# Altium PCB LM135Z.PcbDoc
Units mm, origin at the board's own origin, x right, y up, seen from the top; angles counter-clockwise.
Board outline 116 x 72 mm, 2 copper layers (Top Layer, Bottom Layer); 59 components, 51 nets, 376 pads, 142 vias.
Unrouted connection lines stored in the file: 47.
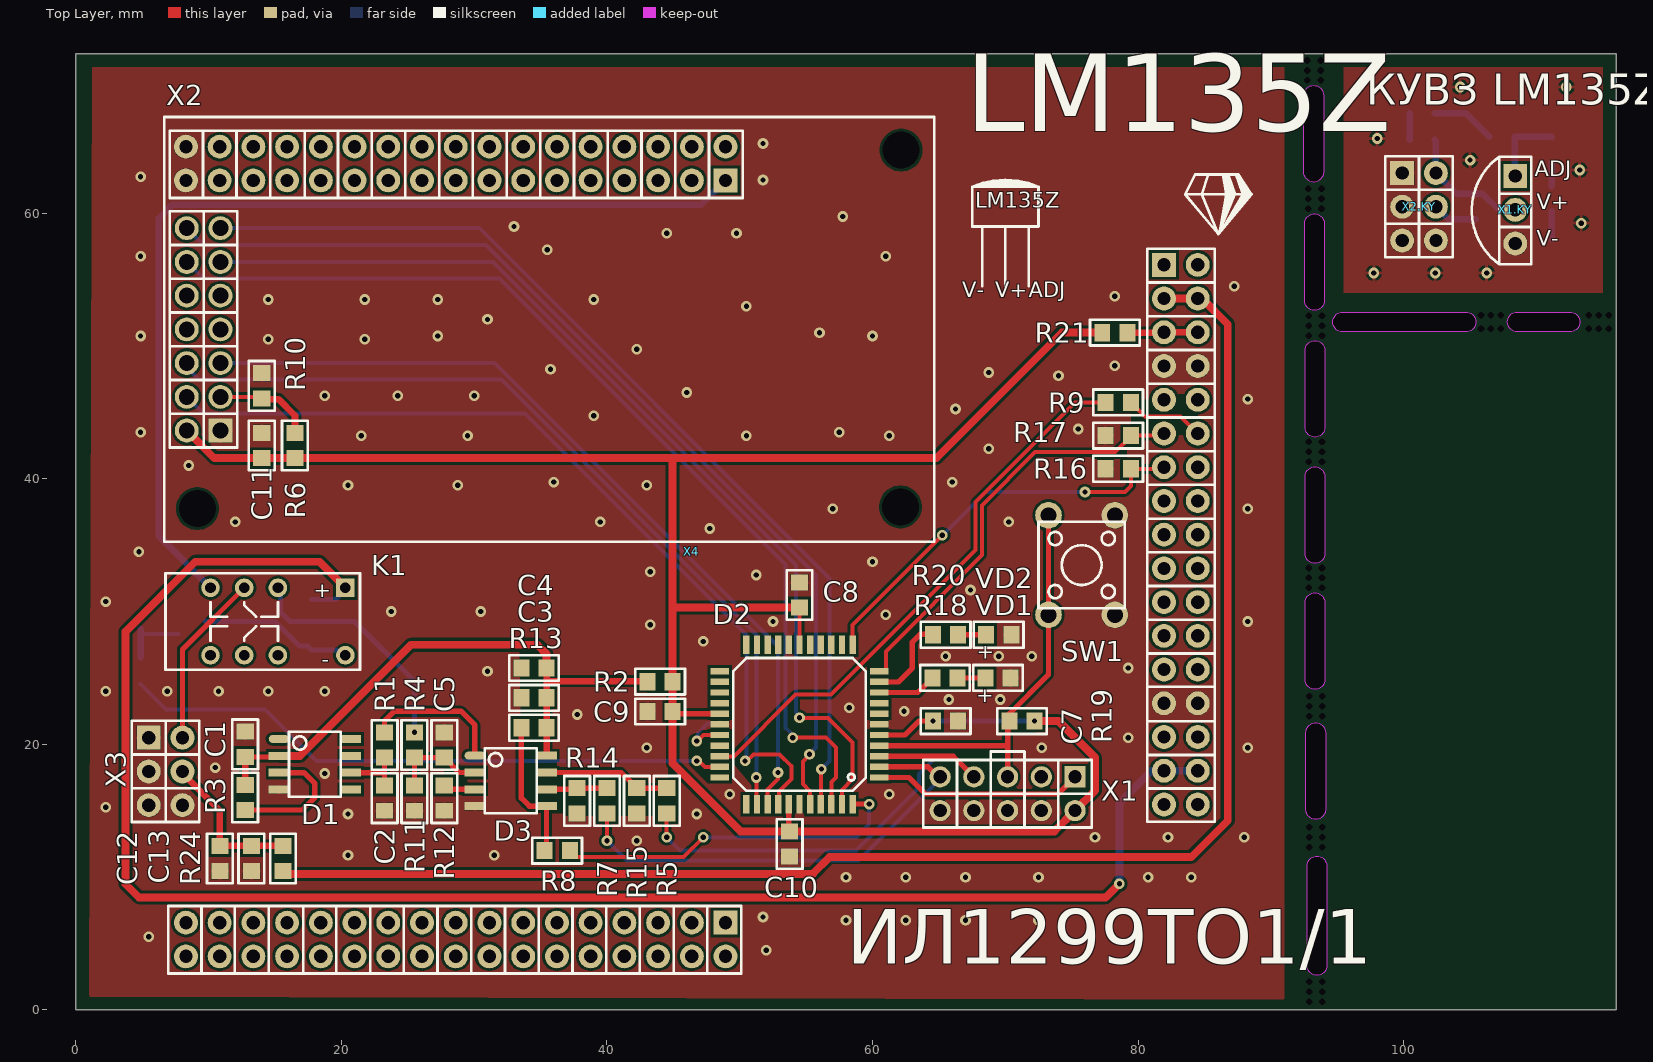
[diagram p0: Top Layer view]
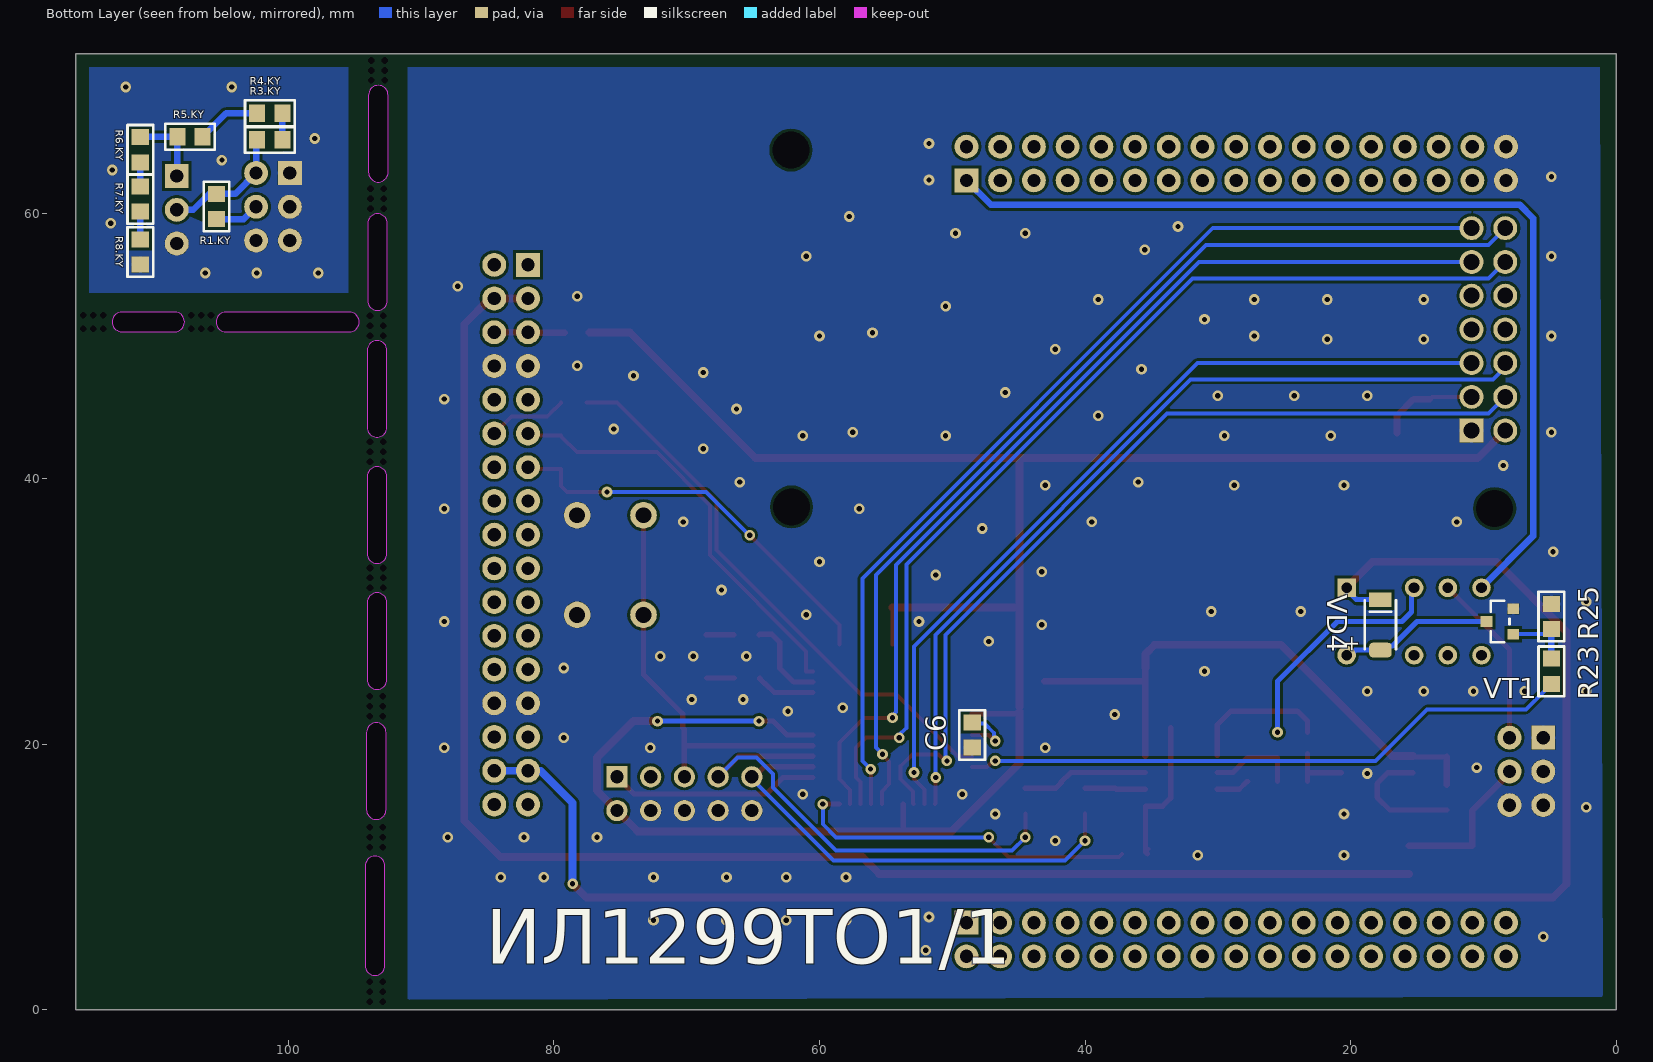
[diagram p1: Bottom Layer view, seen from below]

## Layer stack, top to bottom
Top Solder: solder mask 0.0102, Solder Resist, Dk 3.5
Top Layer: signal copper 0.0356
Dielectric 1: dielectric 0.32, FR-4, Dk 4.8
Bottom Layer: signal copper 0.0356
Bottom Solder: solder mask 0.0102, Solder Resist, Dk 3.5

## Board outline
0,0 116,0 116,72 0,72
cut-out: 94.06,24.87 cw(c93.318,24.87) 92.576,24.87 92.576,30.666 cw(c93.318,30.666) 94.06,30.666
cut-out: 94.21,3.33 cw(c93.468,3.33) 92.727,3.33 92.727,10.839 cw(c93.468,10.839) 94.21,10.839
cut-out: 94.06,34.37 cw(c93.318,34.37) 92.576,34.37 92.576,40.166 cw(c93.318,40.166) 94.06,40.166
cut-out: 94.06,43.87 cw(c93.318,43.87) 92.576,43.87 92.576,49.666 cw(c93.318,49.666) 94.06,49.666
cut-out: 94.022,53.423 cw(c93.28,53.423) 92.539,53.423 92.539,59.219 cw(c93.28,59.219) 94.022,59.219
cut-out: 93.964,63.087 cw(c93.223,63.087) 92.481,63.087 92.481,68.883 cw(c93.223,68.883) 93.964,68.883
cut-out: 94.117,15.087 cw(c93.375,15.087) 92.633,15.087 92.633,20.883 cw(c93.375,20.883) 94.117,20.883
cut-out: 112.527,52.55 cw(c112.527,51.809) 112.527,51.067 108.405,51.067 cw(c108.578,51.809) 108.405,52.55
cut-out: 104.698,52.548 cw(c104.698,51.806) 104.698,51.064 95.25,51.064 cw(c95.423,51.806) 95.25,52.548

## Design rules (kind name [scope] priority, off if disabled: settings)
Clearance [All] p1: gap=0.2 ignorepadtopadclearanceinfootprint=FALSE
ComponentClearance [All] p1: gap=0 collisioncheckmode=3 verticalgap=0 showdistances=FALSE
HoleSize [All] p1: absolutevalues=TRUE maxlimit=3 minlimit=0.025 maxpercent=80.000 minpercent=20.000
HoleToHoleClearance [All] p1: gap=0.2 allowstackedmicrovias=TRUE
MinimumSolderMaskSliver [All] p1: minsoldermaskwidth=0
PolygonConnect [All vs InNet('GND') AND IsVia] p1: connectstyle=Direct reliefconductorwidth=0.254 reliefentries=4 polygonreliefangle="90 Angle" airgapwidth=0.254
RoutingVias [All] p1: holewidth=0.6 width=1.2 viastyle="Through Hole" minholewidth=0.4 minwidth=0.8 maxholewidth=0.8 maxwidth=1.6
SilkToSilkClearance [All] p1: silktosilkclearance=0
SilkToSolderMaskClearance [IsPad] p1: minsilkscreentomaskgap=0 clearancetoexposedcopper=TRUE
SolderMaskExpansion [All] p1: expansion=0.102 istentingtop=FALSE
Width [All] p1: maxlimit=0.6 minlimit=0.2 preferedwidth=0.3
24 further rules are at their usual default settings.

## Classes and differential pairs
component class LM135Z_1: C1 C2 C3 C4 C5 C6 C7 C8 C9 C10 C11 C12 C13 D1 D2 D3 K1 R1 R2 R3 R4 R5 R6 R7 R8 R9 R10 R11 R12 R13 R14 R15 R16 R17 R18 R19 R20 R21 R23 R24 R25 SW1 VD1 VD2 VD4 VT1 X1 X2 X3
component class "Formula connector": R1.KY R3.KY R4.KY R5.KY R6.KY R7.KY R8.KY X1.KY X2.KY X4

## Components (designator, comment, footprint, x,y, rotation, side; value= is the part's Value field where it differs from the comment)
C1 "C0805" 0805 12.75,20 r90 top value=0.1uF
C2 "C0805" 0805 23.25,15.95 r270 top value=1uF
C3 "C0805" 0805 34.5,23.5 r180 top value=1uF
C4 "C0805" 0805 34.5,25.75 r180 top value=47uF
C5 "C0805" 0805 27.75,19.95 r90 top value=0.01uF
C6 "C0805" 0805 48.5,20.7 r270 bottom value=0.1uF
C7 "C0805" 0805 65.5,21.75 r0 top value=10uF
C8 "C0805" 0805 54.5,31.25 r90 top value=0.1uF
C9 "C0805" 0805 44,22.47 r180 top value=0.1uF
C10 "C0805" 0805 53.75,12.5 r270 top value=0.1uF
C11 "C0805" 0805 14,42.5 r90 top value=0.1uF
C12 "C0805" 0805 10.85,11.4 r270 top value=0.1uF
C13 "C0805" 0805 13.225,11.4 r270 top value=47uF
D1 "REF198ESZ" "SOIC-8(Microchip) - duplicate" 18,18.5 r0 top
D2 "ATMEGA16A-AU (TQFP-44)" 44-TQFP 54.5,21.5 r180 top locked
D3 "MCP3201-BI (SO-8)" "SOIC-8(Microchip) - duplicate" 32.75,17.25 r0 top
K1 "V23079A1001B301 TE" V23079A1001B301 14,29.25 r180 top locked
R1 "R0805 Yageo" 0805 23.25,19.95 r90 top value=10
R1.KY "R0805 Yageo" 0805 105.405,60.505 r90 bottom value=0
R2 "R0805 Yageo" 0805 44,24.72 r0 top value=1
R3 "R0805 Yageo" 0805 12.75,16 r90 top value=1k
R3.KY "R0805 Yageo" 0805 101.395,65.525 r0 bottom value=0
R4 "R0805 Yageo" 0805 25.5,19.95 r270 top value=100
R4.KY "R0805 Yageo" 0805 101.395,67.525 r180 bottom value=0
R5 "R0805 Yageo" 0805 44.5,15.75 r90 top value=1k
R5.KY "R0805 Yageo" 0805 107.405,65.755 r180 bottom value=0
R6 "R0805 Yageo" 0805 16.5,42.5 r90 top value=3.9k
R6.KY "R0805 Yageo" 0805 111.145,64.775 r90 bottom value=0
R7 "R0805 Yageo" 0805 40,15.75 r90 top value=1k
R7.KY "R0805 Yageo" 0805 111.145,61.075 r90 bottom value=0
R8 "R0805 Yageo" 0805 36.25,12 r180 top value=1k
R8.KY "R0805 Yageo" 0805 111.145,57.075 r90 bottom value=0
R9 "R0805 Yageo" 0805 78.5,45.75 r180 top value=2.2k
R10 "R0805 Yageo" 0805 14,47 r270 top value=680
R11 "R0805 Yageo" 0805 25.5,15.95 r270 top value=300k
R12 "R0805 Yageo" 0805 27.75,15.95 r270 top value=0
R13 "R0805 Yageo" 0805 34.5,21.25 r0 top value=20k
R14 "R0805 Yageo" 0805 37.75,15.75 r270 top value=20k
R15 "R0805 Yageo" 0805 42.25,15.75 r270 top value=20k
R16 "R0805 Yageo" 0805 78.5,40.75 r0 top value=10k
R17 "R0805 Yageo" 0805 78.5,43.25 r0 top value=10k
R18 "R0805 Yageo" 0805 65.45,25 r0 top value=2.2k
R19 "R0805 Yageo" 0805 71.25,21.75 r180 top value=10k
R20 "R0805 Yageo" 0805 65.5,28.25 r0 top value=2.2k
R21 "R0805 Yageo" 0805 78.25,51 r180 top value=1
R23 "R0805 Yageo" 0805 4.875,25.5 r90 bottom value=4.7k
R24 "R0805 Yageo" 0805 15.6,11.4 r270 top value=0
R25 "R0805 Yageo" 0805 4.875,29.625 r90 bottom value=20k
SW1 "ВКН1" BKN1 75.75,33.5 r90 top
VD1 "LED(0805)" 0805(LED) 69.45,25 r0 top
VD2 "LED(0805)" 0805(LED) 69.5,28.25 r0 top
VD4 "LL4148 NXP" SOD80C 17.75,29 r90 bottom
VT1 "MMBT5551L" SOT-23 8.75,29.25 r90 bottom
X1 "PLD10-2,54" PLD10-2,54 75.25,15 r180 top locked
X1.KY "LM135Z" LM135Z 108.405,60.255 r270 top
X2 "PLD14-2,54" PLD14-2,54 35.25,51.25 r0 top locked
X2.KY "PLD6-2,54" PLD6-2,54 99.895,63.025 r270 top
X3 "PLD6-2,54" PLD6-2,54 5.5,20.5 r270 top
X4 "FORMULA" FORMULA 36.75,33.25 r0 top locked

## Footprints (in the part's own frame and the unit in brackets; to place one, negate y for a bottom-side part, rotate by r counter-clockwise, add the part's x,y. Pads: shape width x height; smd on the part's side, far side on the other; paste and mask are expansions set on the pad)
44-TQFP [mm]
  rect 1.4x0.48 smd: 1(-6,4) 2(-6,3.2) 3(-6,2.4) 4(-6,1.6) 5(-6,0.8) 6(-6,0) 7(-6,-0.8) 8(-6,-1.6) 9(-6,-2.4) 10(-6,-3.2) 11(-6,-4) 23(6,-4) 24(6,-3.2) 25(6,-2.4) 26(6,-1.6) 27(6,-0.8) 28(6,0) 29(6,0.8) 30(6,1.6) 31(6,2.4) 32(6,3.2) 33(6,4)
  rect 0.48x1.4 smd: 12(-4,-6) 13(-3.2,-6) 14(-2.4,-6) 15(-1.6,-6) 16(-0.8,-6) 17(0,-6) 18(0.8,-6) 19(1.6,-6) 20(2.4,-6) 21(3.2,-6) 22(4,-6) 34(4,6) 35(3.2,6) 36(2.4,6) 37(1.6,6) 38(0.8,6) 39(0,6) 40(-0.8,6) 41(-1.6,6) 42(-2.4,6) 43(-3.2,6) 44(-4,6)
  silkscreen extent -5,-5 5,5
0805 [mm]
  rect 1.2x1.3 smd: 1(-0.95,0) 2(0.95,0)
  silkscreen extent -1.87,-0.97 1.87,0.97, body extent -1.05,-0.63 0.95,0.63, height 0.55
0805(LED) [mm]
  rect 1.2x1.3 smd: 1(-0.95,0) 2(0.95,0)
  silkscreen extent -1.87,-0.97 1.87,0.97, body extent -1.03,-0.41 1.03,0.5, height 0.85
BKN1 [mm]
  round 2 hole 1.2: 1(-3.75,2.5) 1(3.75,2.5) 2(-3.75,-2.5) 2(3.75,-2.5)
  silkscreen extent -3.25,-3.25 3.25,3.25, body extent -3.9,-3.25 3.9,3.25, height 5.19
FORMULA [mm]
  rect 1.8x1.8 hole 1: 1(12.18,29.22) VDDF(12.18,-26.68) VEEF(45.2,22.86)
  round 1.8 hole 1: 2(9.64,29.22) 3(7.1,29.22) 4(4.56,29.22) 5(2.02,29.22) 6(-0.52,29.22) 7(-3.06,29.22) 8(-5.6,29.22) 9(-8.14,29.22) 10(-10.68,29.22) 11(-13.22,29.22) 12(-15.76,29.22) 13(-18.3,29.22) 14(-20.84,29.22) 15(-23.38,29.22) 16(-25.92,29.22) 17(12.18,31.76) 18(9.64,31.76) 19(7.1,31.76) 20(4.56,31.76) 21(2.02,31.76) 22(-0.52,31.76) 23(-3.06,31.76) 24(-5.6,31.76) 25(-8.14,31.76) 26(-10.68,31.76) 27(-13.22,31.76) 28(-15.76,31.76) 29(-18.3,31.76) 30(-20.84,31.76) 31(-23.38,31.76) 32(-25.92,31.76) 33(-28.46,-29.22) 34(-25.92,-29.22) 35(-23.38,-29.22) 36(-20.84,-29.22) 37(-18.3,-29.22) 38(-15.76,-29.22) 39(-13.22,-29.22) 40(-10.68,-29.22) 41(-8.14,-29.22) 42(-5.6,-29.22) 43(-3.06,-29.22) 44(-0.52,-29.22) 45(2.02,-29.22) 46(4.56,-29.22) 47(7.1,-29.22) 48(9.64,-29.22) 49(-28.46,-26.68) 50(-25.92,-26.68) 51(-23.38,-26.68) 52(-20.84,-26.68) 53(-18.3,-26.68) 54(-15.76,-26.68) 55(-13.22,-26.68) 56(-10.68,-26.68) 57(-8.14,-26.68) 58(-5.6,-26.68) 59(-3.06,-26.68) 60(-0.52,-26.68) 61(2.02,-26.68) 62(4.56,-26.68) 63(7.1,-26.68) 64(9.64,-26.68) +5V(45.2,-15.24) +5V(47.74,-15.24) +5V_VCCF(45.2,20.32) +5V_VCCS(47.74,20.32) +5V_VDDF(45.2,17.78) +5V_VDDS(47.74,17.78) +12V(45.2,-12.7) +12V(47.74,-12.7) -12V(45.2,-17.78) -12V(47.74,-17.78) GND(-28.46,29.22) GND(-28.46,31.76) GND(45.2,-10.16) GND(45.2,15.24) GND(47.74,-10.16) GND(47.74,15.24) IN-OUT1(47.74,10.16) IN-OUT2(47.74,7.62) IN-OUT3(47.74,5.08) IN-OUT4(47.74,2.54) IN-OUT5(47.74,0) IN-OUT6(47.74,-2.54) IN-OUT7(47.74,-5.08) IN-OUT8(47.74,-7.62) NC(45.2,12.7) NC(47.74,12.7) OUT1(45.2,10.16) OUT2(45.2,7.62) OUT3(45.2,5.08) OUT4(45.2,2.54) OUT5(45.2,0) OUT6(45.2,-2.54) OUT7(45.2,-5.08) OUT8(45.2,-7.62) VDDS(12.18,-29.22) VEES(47.74,22.86)
  silkscreen extent -29.8,-30.51 49.02,32.97, body extent -29.79,-30.4 48.98,32.92, height 3
LM135Z [mm]
  rect 1.8x1.8 hole 1: 1(-2.54,0)
  round 1.8 hole 1: 2(0,0) 3(2.54,0)
  silkscreen extent -4,-1.2 4.1,1.2, body extent -4.02,-1.25 4.1,1.25, height 8.5
PLD6-2,54 [mm]
  rect 1.8x1.8 hole 1: 1(0,-0.01)
  round 1.8 hole 1: 2(0,2.53) 3(2.54,-0.01) 4(2.54,2.53) 5(5.08,-0.01) 6(5.08,2.53)
  silkscreen extent -1.27,-1.28 6.35,3.8
PLD10-2,54 [mm]
  rect 1.6x1.6 hole 1: 1(0,-2.55)
  round 1.6 hole 1: 2(0,-0.01) 3(2.54,-2.55) 4(2.54,-0.01) 5(5.08,-2.55) 6(5.08,-0.01) 7(7.62,-2.55) 8(7.62,-0.01) 9(10.16,-2.55) 10(10.16,-0.01)
  silkscreen extent -1.27,-4.45 11.43,1.26
PLD14-2,54 [mm]
  round 1.2 hole 2.8 unplated: 0(-26.1,-13.5) 0(26.85,-13.37) 0(26.9,13.5)
  rect 1.8x1.8 hole 1.2: 1(-24.36,-7.62)
  round 1.8 hole 1.2: 2(-26.9,-7.62) 3(-24.36,-5.08) 4(-26.9,-5.08) 5(-24.36,-2.54) 6(-26.9,-2.54) 7(-24.36,0) 8(-26.9,0) 9(-24.36,2.54) 10(-26.9,2.54) 11(-24.36,5.08) 12(-26.9,5.08) 13(-24.36,7.62) 14(-26.9,7.62)
  silkscreen extent -28.6,-16 29.4,16
SOD80C [mm]
  rrect50% 1.1x1.7 smd: 1(-1.9,0)
  rect 1.1x1.7 smd: 2(1.9,0)
  silkscreen extent -1.85,-1.17 1.85,1.17, body extent -1.9,-0.8 1.8,0.8, height 1.55
"SOIC-8(Microchip) - duplicate" [mm]
  oval 1.55x0.6 smd: 1(-2.7,1.905)
  rect 1.55x0.6 smd: 2(-2.7,0.635) 3(-2.7,-0.635) 4(-2.7,-1.905) 5(2.7,-1.905) 6(2.7,-0.635) 7(2.7,0.635) 8(2.7,1.905)
  silkscreen extent -1.95,-2.45 1.95,2.45, body extent -3,-2.45 3,2.45, height 1.98
SOT-23 [mm]
  rect 0.8x0.9 smd: 1(-0.95,-1) 1(-0.95,-1) 2(0.95,-1) 2(0.95,-1) 3(0,1) 3(0,1)
  silkscreen extent -1.55,-0.72 1.55,0.7, body extent -1.5,-1.25 1.5,1.25, height 1.05
V23079A1001B301 [mm]
  rect 1.4x1.4 hole 0.8: 1(-6.3,-2.54)
  round 1.4 hole 0.8: 3(-1.22,-2.54) 4(1.32,-2.54) 5(3.86,-2.54) 8(3.86,2.54) 9(1.32,2.54) 10(-1.22,2.54) 12(-6.3,2.54)
  silkscreen extent -7.4,-3.63 7.25,3.63, body extent -7.25,-3.6 7.25,3.6, height 9.4

## Part data
C1 C2 C3 C4 C5 C6 C7 C8 C9 C10 C11 C12 C13: ComponentHeigt=1.3, Firme=AVX, KIND=Конденсатор, Leadform=SMD, Packaging=0805
D2: Component Link=www.honeywell.com/radhard, KIND=Микросхема, Leadform="по чертежу", Note="Установка по чертежу"
D3: ComponentHeigt=1.8, Firme=Linear, KIND=Микросхема, Leadform=формована, Packaging=SOT-223
R1 R1.KY R2 R3 R3.KY R4 R4.KY R5 R5.KY R6 R6.KY R7 R7.KY R8 R8.KY R9 R10 R11 R12 R13 R14 R15 R16 R17 R18 R19 R20 R21 R23 R24 R25: ComponentHeigt=0.6, Firme=Yageo, KIND=Резистор, Leadform=SMD, Packaging=0805
SW1: Component Heigt=5.2, Component Weigt=1, KIND="Выключатель кнопочный ВКН-1 АСЖР.642130.003ТУ", Leadform="в отверстия по чертежу", NN=25100618
VD1 VD2: ComponentHeigt=0.75, Firme=Kingbright, KIND="Светодиод L-1154GD Kingbright", Leadform="в отверстия", NN=24003000
VD4: Component Link=http://www.nxp.com, ComponentHeigt=1.6, Firme=NXP, KIND="Диод LL4148 NXP", Leadform=SMD, NN=24009301, Packaging=SOD-80C
VT1: ComponentHeigt=1.1, Firme=ONS, KIND="Транзистор MMBT5551L*G ONS", Leadform=SMD, NN=24007468, Packaging=SOT-23
X1 X2 X2.KY X3: ComponentHeigt=5.5, Name=Вилка, Specification="Вилка PLD2-2 *", Typ=PLD2-2

## Free pads (board coordinates)
  round 0 hole 0.5 unplated: 38(93.75,70.75) 38(93.808,61.086) 38(93.845,32.533) 38(93.845,42.033) 38(93.845,51.533) 38(93.875,0.625) 38(93.875,13) 38(93.875,22.875) 38(106.567,52.309) 38(114.698,52.309) 39(93.75,71.5) 39(93.808,61.836) 39(93.845,33.283) 39(93.845,42.783) 39(93.845,52.283) 39(93.875,1.375) 39(93.875,2.125) 39(93.875,13.75) 39(93.875,23.625) 39(105.817,52.309) 39(113.948,52.309) 41(92.75,70) 41(92.75,70.75) 41(92.808,60.336) 41(92.808,61.086) 41(92.845,31.783) 41(92.845,32.533) 41(92.845,41.283) 41(92.845,42.033) 41(92.845,50.783) 41(92.845,51.533) 41(92.875,0.625) 41(92.875,12.25) 41(92.875,13) 41(92.875,22.125) 41(92.875,22.875) 41(106.567,51.309) 41(107.317,51.309) 41(114.698,51.309) 41(115.448,51.309) 42(92.75,71.5) 42(92.808,61.836) 42(92.845,33.283) 42(92.845,42.783) 42(92.845,52.283) 42(92.875,1.375) 42(92.875,2.125) 42(92.875,13.75) 42(92.875,23.625) 42(105.817,51.309) 42(113.948,51.309) 43(93.75,70) 43(93.808,60.336) 43(93.845,31.783) 43(93.845,41.283) 43(93.845,50.783) 43(93.875,12.25) 43(93.875,22.125) 43(107.317,52.309) 43(115.448,52.309)

## Via types
v1: diameter 0.8, hole 0.4, Top Layer to Bottom Layer, tented both sides, 134 vias
v2: diameter 0.8, hole 0.4, Top Layer to Bottom Layer, 8 vias

## Nets (pads, with @x,y where several pads share a name; then routed paths per layer and width w, separated by ;. In a path a pad name is that pad's centre, name@x,y a point inside that pad or via, vN(x,y) a via of type N, cw(c..) or ccw(c..) an arc to the next point about the centre after c; other vN are vias at no path point)
+5V_ADC: C1.1 C3.1 C4.1 D1.2 D3.8 R2.1 R3.2 R13.2 | length 43.9
  Top Layer w0.4: C1.1 15.215,19.05 D1.2
  Top Layer w0.5: R3.2 C1.1 ; D3.8 R13.2 C3.1 35.45,24.8 ; C4.1 35.45,24.8 ; R2.1@43.05,24.75 35.5,24.75 35.45,24.8
  Top Layer w0.6: D1.2 16.885,19.135 25.25,27.5 34.75,27.5 35.45,26.8 C4.1
+5V_CONST: K1.1 VD4.2 X4.+5V | length 130.3
  Top Layer w0.6: K1.1 18.34,33.75 9,33.75 3.75,28.5 3.75,9.47 4.77,8.45 77.542,8.45 v1(78.592,9.5)
  Bottom Layer w0.4: VD4.2 19.566,30.9 19.8,31.134 19.8,31.29 K1.1
  Bottom Layer w0.6: v1(78.592,9.5) 78.592,15.592 81.01,18.01 81.95,18.01 X4.+5V@84.49,18.01
+5V_LM: C12.1 C13.1 R24.1 X3.4 | length 11.5
  Top Layer w0.5: X3.4 8.03,17.825 8.837,17.017 8.837,17.014 10.85,15.002 C12.1 C13.1 R24.1
+5V_LM_KY: R1.KY.1 X2.KY.4 | length 3.4
  Bottom Layer w0.5: X2.KY.4 103.355,59.555 R1.KY.1
+5V_MC: C7.1 C8.1 C9.1 C10.1 C11.1 D2.5 D2.17 D2.27 D2.38 R2.2 R6.1 R19.1 R21.2 X1.2 X2.2 | length 169.9
  Top Layer w0.3: C10.1@53.7,13.5 C10.1 ; D2.17 C8.1
  Top Layer w0.4: C9.1 45.12,22.3 D2.27 ; C10.1@53.7,13.5 D2.38 ; D2.5 62.45,20.7 63.5,21.75 v1(64.55,21.75)
  Top Layer w0.6: X2.2 10.43,41.55 C11.1 R6.1 45.05,41.55 ; C9.1 44.95,18.55 50.05,13.45 C10.1 73.69,13.45 X1.2 76.75,16.51 76.75,19 74,21.75 v1(72.2,21.75) ; C9.1@44.95,22.82 R2.2 44.95,41.45 45.05,41.55 ; 45,30.3 C8.1 ; R21.2 74.25,51 64.8,41.55 45.05,41.55
  Bottom Layer w0.4: v1(64.55,21.75) v1(72.2,21.75)
+5V_VCC: R24.2 X4.+5V_VCCF X4.+5V_VCCS | length 115.8
  Top Layer w0.6: R24.2@15.6,10.25 55.5,10.25 56.75,11.5 84,11.5 86.75,14.25 86.75,51.635 84.815,53.57 X4.+5V_VCCS X4.+5V_VCCF
+5V_VDD: R21.1 X4.+5V_VDDF X4.+5V_VDDS | length 5.3
  Top Layer w0.5: R21.1 81.92,51 X4.+5V_VDDF X4.+5V_VDDS
ADJ_KY: R5.KY.1 R6.KY.2 X1.KY.1 | length 5.8
  Bottom Layer w0.5: X1.KY.1 108.355,62.845 R5.KY.1 111.115,65.755 R6.KY.2
DB4_LCD: D2.43 X2.11 | length 74.2
  Top Layer w0.3: v1(54.5,22) 56.654,22 58.5,20.154 58.5,17.375 57.7,16.575 D2.43
  Bottom Layer w0.3: X2.11 31.42,56.33 54.25,33.5 54.25,22.439 54.5,22.189 v1(54.5,22)
DB5_LCD: D2.42 X2.12 | length 75.8
  Top Layer w0.3: v1(54,20.5) 56.5,20.5 57.25,19.75 57.25,17.5 56.9,17.15 D2.42
  Bottom Layer w0.3: X2.12 9.6,55.08 31.92,55.08 53.442,33.558 53.442,21.248 54,20.689 v1(54,20.5)
DB6_LCD: D2.41 X2.13 | length 74.1
  Top Layer w0.3: D2.41 56.1,17.724 56.116,17.74 56.116,18.103 v1(56.15,18.137)
  Bottom Layer w0.3: X2.13 30.38,58.87 56.75,32.5 56.75,18.737 v1(56.15,18.137)
DB7_LCD: D2.40 X2.14 | length 76.1
  Top Layer w0.3: v1(55.25,19.25) 55.25,19.224 54.75,18.724 54.75,17 55.287,16.463 55.287,15.513 D2.40
  Bottom Layer w0.3: X2.14 9.6,57.62 30.88,57.62 55.75,32.75 55.75,19.776 55.25,19.276 v1(55.25,19.25)
DI1_MC: R9.1 X4.IN-OUT1 | length 6
  Top Layer w0.3: R9.1 79.45,45.7 79.9,45.25 79.95,45.25 80.5,44.7 83.2,44.7 X4.IN-OUT1
DO1_MC: D2.11 R17.2 X4.OUT1 | length 32
  Top Layer w0.3: D2.11 D2.11@61,25.5 ; D2.11@61,25.5 61,27 68.25,34.25 68.25,38 72.25,42 75.457,42 78.25,42 79.45,43.2 R17.2 81.79,43.25 X4.OUT1
DO2_MC: D2.12 R16.2 X4.OUT2 | length 30.6
  Top Layer w0.3: D2.12 58.5,29 v1(65.25,35.75) ; v1(76,39) 79,39 79.45,39.45 R16.2 81.83,40.75 X4.OUT2
  Bottom Layer w0.3: v1(65.25,35.75) 65.288,35.75 68.538,39 v1(76,39)
EN_LCD: D2.35 X2.6 | length 64.3
  Top Layer w0.3: v1(51.25,17.5) 51.25,15.55 D2.35
  Bottom Layer w0.3: X2.6 8.35,48.4 9.29,47.46 32.04,47.46 51.25,28.25 v1@51.25,17.526
GND: C1.2 C2.2 C3.2 C4.2 C5.2 C6.2 C7.2 C8.2 C9.2 C10.2 C11.2 C12.2 C13.2 D1.4 D2.6 D2.18 D2.28 D2.39 D3.4 R10.1 R11.2 R12.2 R14.2 R15.2 R16.1 R17.1 R25.2 SW1.2 VD1.2 VD2.2 VT1.2 X1.4 X1.6 X1.8 X1.10 X2.1 X3.1 X3.3 X3.5 X3.6 X4.GND
  other v1: 52,4.5 5.5,5.5 58,6.75 62.5,6.75 67,6.75 72.5,6.75 51.75,7 58,10 62.5,10 67,10 72.5,10 80.75,10 84,10 20.5,11.65 31.5,11.65 42.25,12.75 76.75,13 82.25,13 88,13 20.5,14.75 46.75,14.75 2.25,15.25 49.25,16.25 61.25,16.25 18.75,17.8 10.5,18.25 43,19.75 72.75,19.75 88.25,19.75 79.25,20.5 37.75,22.25 58.25,22.75 2.25,24 6.875,24 10.75,24 14.5,24 18.75,24 31,25.5 79.25,25.75 47.25,27.75 43.25,29 88.25,29.25 61,29.75 23.75,30 30.5,30 2.25,30.75 51.25,32.75 43.25,33 60,33.75 4.75,34.5 47.75,36.25 12,36.75 39.5,36.75 70.25,36.75 57,37.75 88.25,37.75 20.5,39.5 28.75,39.5 43,39.5 36,39.75 66,39.75 8.5,41 68.75,42.25 21.5,43.25 29.5,43.25 50.5,43.25 61.25,43.25 4.875,43.5 57.5,43.5 75.5,43.75 39,44.75 66.25,45.25 88.25,46 18.75,46.25 24.25,46.25 30,46.25 46,46.5 74,47.75 68.75,48 35.75,48.25 78.25,48.5 42.25,49.75 14.5,50.5 21.75,50.5 4.875,50.75 27.25,50.75 60,50.75 56,51 31,52 50.5,53 14.5,53.5 21.75,53.5 27.25,53.5 39,53.5 78.25,53.75 87.25,54.5 4.875,56.75 61,56.75 35.5,57.25 44.5,58.5 49.75,58.5 33,59 57.75,59.75 51.75,62.5 4.875,62.75 51.75,65.25
  other v2: 62.375,22.5 65.75,23.375 69.625,23.375 65.5,26.625 69.5,26.625 72,26.625 52.5,29.25 67.375,31.625
GND_KY: R8.KY.1 X1.KY.3 X2.KY.1 X2.KY.3 X2.KY.5 X2.KY.6
  other v1: 97.75,55.5 102.375,55.5 106.25,55.5 113.375,59.25 113.25,63.25 105,64 98,65.625 104.25,69.5 112.25,69.5
LED1: D2.9 R18.1 | length 4.5
  Top Layer w0.4: D2.9 63.4,23.9 64.05,24.55 64.1,24.55 64.5,24.95 R18.1
LED2: D2.10 R20.1 | length 6.7
  Top Layer w0.4: D2.10 61.95,24.7 63,25.75 63,27.7 63.584,28.284 64.516,28.284 R20.1
MI_MC: D2.2 R7.1 X1.9 | length 35.4
  Top Layer w0.3: v1(40,12.75) R7.1
  Top Layer w0.4: D2.2 64.179,18.3 64.929,17.55 X1.9
  Bottom Layer w0.3: v1(40,12.75) 41.5,11.25 58.957,11.25 65.09,17.383 X1.9
MO_MC: D2.1 X1.1 | length 15.8
  Top Layer w0.4: D2.1 62.75,17.5 63.99,16.26 73.96,16.26 X1.1
nCS_MC: D2.44 R8.1 | length 26.4
  Top Layer w0.3: R8.1@37.2,11.75 37.45,11.5 45.75,11.5 v1(47.25,13)
  Top Layer w0.4: D2.44 v1(59.75,15.5)
  Bottom Layer w0.3: v1(47.25,13) 58.75,13 59.75,14 v1(59.75,15.5)
NetC2_1: C2.1 D1.6 R1.1 | length 5.1
  Top Layer w0.4: D1.6 23.25,17.865 ; 23.25,17.655 23.25,17.2 23.25,17.865 ; R1.1@23.25,19.3 23.25,17.865
NetC5_1: C5.1 D3.2 R4.2 R11.1 | length 6.8
  Top Layer w0.4: R11.1@25.5,17.2 R4.2 C5.1 28.865,17.885 D3.2
NetC6_1: C6.1 D2.29 | length 4.6
  Top Layer w0.3: v1(46.75,20.25) 46.812,20.25 47.276,20.714 48.486,20.714 D2.29
  Bottom Layer w0.3: v1(46.75,20.25) 46.872,20.372 46.872,20.872 47.576,21.576 48.426,21.576 C6.1
NetD2_31: D2.31 R9.2 | length 42.2
  Top Layer w0.3: D2.31 49.548,19.1 54.198,23.75 56.875,23.75 67.75,34.625 67.75,38.25 75.25,45.75 R9.2
NetD3_3: D3.3 R12.1 | length 2.5
  Top Layer w0.4: R12.1@27.75,17.2 27.8,17.2 28.385,16.615 D3.3
NetD3_5: D3.5 R8.2 R13.1 | length 11.2
  Top Layer w0.3: R8.2@35.2,12.1 R8.2
  Top Layer w0.4: R13.1 33.55,15.95 34.155,15.345 D3.5 35.45,11.9 R8.2@35.3,11.75
NetD3_6: D3.6 R7.2 R14.1 | length 4.6
  Top Layer w0.4: D3.6 37.665,16.615 R14.1 R7.2
NetD3_7: D3.7 R5.2 R15.1 | length 9.6
  Top Layer w0.4: D3.7 41.065,17.885 41.8,17.15 41.8,17.1 42.2,16.7 R15.1 R5.2
NetK1_12: K1.12 VD4.1 VT1.3 | length 11.7
  Bottom Layer w0.4: VT1.3@9.8,29.25 9.75,29.25 15,29.25 16.846,27.404 17.446,27.404 VD4.1 19.639,27.1 20.029,26.71 K1.12
NetR3.KY_1: R3.KY.1 R4.KY.2 | length 2
  Bottom Layer w0.5: R3.KY.1 R4.KY.2
NetR4.KY_1: R4.KY.1 R5.KY.2 | length 4.8
  Bottom Layer w0.5: R4.KY.1 104.685,67.525 R5.KY.2
NetR6.KY_1: R6.KY.1 R7.KY.2 | length 1.8
  Bottom Layer w0.5: R7.KY.2 R6.KY.1
NetR7.KY_1: R7.KY.1 R8.KY.2 | length 2.1
  Bottom Layer w0.5: R8.KY.2 R7.KY.1
NetR18_2: R18.2 VD1.1 | length 2.1
  Top Layer w0.4: R18.2 VD1.1
NetR20_2: R20.2 VD2.1 | length 2.1
  Top Layer w0.4: R20.2 VD2.1
NetR23_2: R23.2 R25.1 VT1.1 | length 4.6
  Bottom Layer w0.3: R25.1@5.25,28.3 VT1.1@7.75,28.3
  Bottom Layer w0.5: R23.2@4.875,26.575 4.875,28.575 R25.1
ON_RELE1: D2.32 R23.1 | length 46.2
  Top Layer w0.3: v1(46.75,18.75) 46.939,18.75 47.389,18.3 D2.32
  Bottom Layer w0.3: R23.1 6.8,22.625 14.25,22.625 18.125,18.75 v1(46.75,18.75)
RS_LCD: D2.37 X2.4 | length 66.5
  Top Layer w0.3: v1(50.4,18.75) 50.526,18.75 51.026,19.25 53,19.25 53.9,18.35 53.9,17.4 52.938,16.438 52.938,15.538 D2.37
  Bottom Layer w0.3: X2.4 9.6,44.92 33.83,44.92 50.5,28.25 50.5,18.85 v1(50.4,18.75)
RST_MC: D2.4 R19.2 SW1.1 X1.5 | length 30.6
  Top Layer w0.3: R19.2@70.187,21.637 R19.2
  Top Layer w0.4: D2.4 70.187,19.9 ; X1.5@70.187,17.567 70.187,19.9 ; R19.2@70.187,21.137 70.187,19.9 ; R19.2@70.3,21.25 70.3,22.3 73.25,25.25 73.25,29.75 SW1.1@73.25,37.25
RW_LCD: D2.36 X2.5 | length 63
  Top Layer w0.3: D2.36 52.1,16.6 52.878,17.378 v1(52.878,17.878)
  Bottom Layer w0.3: X2.5 31.54,48.71 52.878,27.372 v1(52.878,17.878)
SCK_MC: D2.3 R5.1 X1.7 | length 36.8
  Top Layer w0.3: v1(44.5,13) R5.1
  Top Layer w0.4: D2.3 66.08,19.1 67.14,18.04 67.37,18.04 X1.7@67.38,18.05
  Bottom Layer w0.3: v1(44.5,13) 45.5,12 58.75,12 63.5,16.75 63.5,17.75 64.75,19 66.18,19 X1.7
Sleep: D1.3 R3.1 | length 9.7
  Top Layer w0.4: R3.1 17.05,15.05 18,16 18,17.049 17.184,17.865 D1.3
V+_KY: R1.KY.2 R3.KY.2 X1.KY.2 X2.KY.2 | length 9.7
  Bottom Layer w0.5: R3.KY.2 102.425,65.445 X2.KY.2 103.995,61.455 R1.KY.2 105.955,61.455 107.155,60.255 X1.KY.2
VO: R6.2 R10.2 X2.3 | length 7.5
  Top Layer w0.3: X2.3 13.88,46.17 R10.2 R10.2@14.05,46
  Top Layer w0.5: R10.2@14.05,46 15.25,46 16.5,44.75 R6.2
VOUT: K1.4 X3.2 | length 13.2
  Top Layer w0.4: X3.2 8.03,20.601 8.03,27.14 K1.4
VOUT_ADC: K1.3 R4.1 | length 18
  Bottom Layer w0.4: K1.3 15.411,31.599 15.411,29.969 16.13,29.25 21,29.25 25.5,24.75 v1(25.5,20.9)
VOUT_F: K1.5 X4.1 | length 73.3
  Bottom Layer w0.5: K1.5 6.25,35.68 6.25,59.625 7.267,60.642 47.102,60.642 X4.1
VREF: D3.1 R1.2 | length 10.7
  Top Layer w0.4: R1.2 23.25,21.75 24,22.5 29,22.5 30.05,21.45 D3.1
pads on no net: D1.1 D1.5 D1.7 D1.8 D2.7 D2.8 D2.13 D2.14 D2.15 D2.16 D2.19 D2.20 D2.21 D2.22 D2.23 D2.24 D2.25 D2.26 D2.30 D2.33 D2.34 K1.8 K1.9 K1.10 X1.3 X2.0 X2.7 X2.8 X2.9 X2.10 X4.2 X4.3 X4.4 X4.5 X4.6 X4.7 X4.8 X4.9 X4.10 X4.11 X4.12 X4.13 X4.14 X4.15 X4.16 X4.17 X4.18 X4.19 X4.20 X4.21 X4.22 X4.23 X4.24 X4.25 X4.26 X4.27 X4.28 X4.29 X4.30 X4.31 X4.32 X4.33 X4.34 X4.35 X4.36 X4.37 X4.38 X4.39 X4.40 X4.41 X4.42 X4.43 X4.44 X4.45 X4.46 X4.47 X4.48 X4.49 X4.50 X4.51 X4.52 X4.53 X4.54 X4.55 X4.56 X4.57 X4.58 X4.59 X4.60 X4.61 X4.62 X4.63 X4.64 X4.+12V X4.-12V X4.IN-OUT2 X4.IN-OUT3 X4.IN-OUT4 X4.IN-OUT5 X4.IN-OUT6 X4.IN-OUT7 X4.IN-OUT8 X4.NC X4.OUT3 X4.OUT4 X4.OUT5 X4.OUT6 X4.OUT7 X4.OUT8 X4.VDDF X4.VDDS X4.VEEF X4.VEES

## Polygon pours and split planes (outlines as drawn)
GND_KY on Top Layer "NONET_L-01_P-001" (solid, remove dead copper, pour order 3): 95.5,71 95.5,54 115,54 115,71
GND on Top Layer "NONET_L-01_P-001" (solid, remove dead copper, pour order 1): 1.25,71 1,1 91,0.75 91,71
GND_KY on Bottom Layer "NONET_L-01_P-001" (solid, remove dead copper, pour order 2): 95.5,71 95.5,54 115,54 115,71
GND on Bottom Layer "NONET_L-01_P-001" (solid, remove dead copper, pour order 0): 1.25,71 1,1 91,0.75 91,71

## Other copper
Top Layer:
  pour cut-out: 24.625,20.5 24.625,19.408 26.375,19.408 26.375,20.5
  pour cut-out: 22.375,20.375 22.375,19.5 24.125,19.5 24.125,20.375
  pour cut-out: 46.241,18.41 47.6,18.41 47.6,17.06
  pour cut-out: 46.15,20.369 46.15,18.75 46.75,18.75
  pour cut-out: 49.4,18.743 51.25,18.743 51.25,16.5
  pour cut-out: 77.25,52 77.25,50.125 79.25,50.125 79.25,51.875
  pour cut-out: 43,25.625 43,23.75 44.95,23.75 44.95,25.69
  pour cut-out: 70.023,22.6 70.023,20.75 72.375,20.75 72.375,22.75
  pour cut-out: 64.375,26 64.375,24.125 66.5,24.125 66.5,25.875
  pour cut-out: 64.5,29.25 64.5,27.375 66.625,27.375 66.625,29.25
  pour cut-out: 77.5,46.75 77.5,44.9 79.5,44.9 79.5,46.75
  pour cut-out: 15.5,43.5 15.5,41.55 17.5,41.55 17.5,43.5
  pour cut-out: 14.63,12.35 14.63,10.25 16.5,10.25 16.5,12.375
  pour cut-out: 11.75,16.75 11.75,15.05 13.75,15.05 13.75,16.75
  pour cut-out: 33.423,25.623 33.423,27.375 33.55,19.25 35.45,19.25 35.45,25.75
  pour cut-out: 33.55,21.25 33.55,15.345 35.45,15.345
  pour cut-out: 37.75,14.8 35.45,14.8 35.45,15.345
  pour cut-out: 34.75,19.25 34.75,15.345 36.25,15.345 36.25,19.25 36.375,19.25
  pour cut-out: 36.78,16.615 36.78,14.625 45.5,14.625 45.5,16.75
  pour cut-out: 79.575,45.825 79.45,45.7 79.45,43.2 81.74,43.2 81.87,43.33
  pour cut-out: 81.95,45.95 79.7,45.95 79.45,45.7
  pour cut-out: 84.49,45.95 84.49,43.41 84.41,43.33 81.87,43.33
  pour cut-out: 50.4,18.75 51.25,17.9 51.25,17.5
  pour cut-out: 34.539,26.99 34.539,24.78 35.45,24.78
  pour cut-out: 27.75,19 27.75,16.615 30.05,16.615
  pour cut-out: 44.59,18.44 44.59,17.25 45.75,17.25
  pour cut-out: 63,25.75 64.5,25.75 64.5,24.975
  pour cut-out: 73.98,16.28 74.248,15.01 75.25,15.01
  pour cut-out: 76.5,42 76.5,41.5 76.75,41.5
  pour cut-out: 76.5,41.5 78.25,41.5 78.25,42
  pour cut-out: 79.155,42.4 79.155,41.5 77.75,41.5
  pour cut-out: 64.095,28.692 63.25,28.692 63.25,30.058
  pour cut-out: 54.5,22.095 54.5,23.75 54.25,23.75
  pour cut-out: 54.5,22 54.5,20.5 54,20.5
  pour cut-out: 82.763,43.555 83.75,43.555 83.75,44.5
  pour cut-out: 82.975,46.375 83.488,46.375 83.488,45.812
  pour cut-out: 82.975,46.375 82.975,45.25 84,45.25
  pour cut-out: 57.25,17.5 58.4,17.5 58.4,17.275
  pour cut-out: 55,18.974 54.75,18.974 54.75,18.474 54.276,18.474
  pour cut-out: 54.276,18.474 54.276,20.25 55.25,20.25
  pour cut-out: 53.571,16.4 55.018,16.4 55.018,16.732
  pour cut-out: 53.5,19.25 53.5,18.25 54.5,18.25
Bottom Layer:
  pour cut-out: 48.5,21.65 47.315,21.65 47.315,20.016
  pour cut-out: 106.255,59.25 106.255,60.255 108.405,60.255
  pour cut-out: 99.645,68.375 99.645,64.675 103.145,64.675 103.145,68.375
  pour cut-out: 100.375,66.25 100.375,64.555 102.375,64.555 102.375,66.25
  pour cut-out: 100.375,68.375 100.375,66.625 102.5,66.625 102.5,68.375
  pour cut-out: 106.5,66.625 106.5,64.905 108.75,64.905 108.75,66.625
  pour cut-out: 104.435,61.455 104.435,59.25 106.375,59.25 106.375,61.375
  pour cut-out: 110.125,62.125 112.125,62.125 112.125,60.125 110.125,60.125
  pour cut-out: 110.175,65.755 112,65.755 112,63.625 110.25,63.625
  pour cut-out: 8.35,48.71 8.35,46.17 10.89,46.17
  pour cut-out: 8.35,58.87 8.35,56.33 10.89,56.33
  pour cut-out: 52.875,20.75 56.15,20.75 56.15,18.137
  pour cut-out: 55.25,19.237 56.15,19.237 56.15,18.137
  pour cut-out: 3.875,26.5 3.875,24.75 5.875,24.75 5.875,26.5
  pour cut-out: 65.09,17.55 67.63,17.55 67.63,18.559
  pour cut-out: 54.499,20.5 54.499,19.5 55,19.5
  pour cut-out: 10.89,60.14 10.89,59.5 10.25,59.5

## Silkscreen, mask and mechanical layers (free items; w line width, h text height)
Top Overlay:
  region: 67.5,62 72.5,62 71,62.5 69,62.5
  region: 86.045,58.416 86.545,61.416 87.295,61.416
  region: 88.545,61.416 86.045,58.416 87.795,61.416
  region: 87.295,61.416 86.545,61.416 86.295,62.916 86.795,62.916
  region: 87.795,61.416 88.545,61.416 87.545,62.916 87.295,62.916
  lines w0.2: 68.25,54.5 68.25,59 ; 70,54.5 70,59 ; 71.75,54.5 71.75,59 ; 85.295,62.916 84.795,61.416 86.045,58.416 ; 86.795,62.916 87.295,61.416 86.045,58.416 ; 107.205,56.155 cw(c110.107,60.205) 107.205,64.255 ; 67.5,62 cw(c70,56.063) 72.5,62 ; 67.5,62 72.5,62 ; 67.5,62 67.5,59 72.5,59 72.5,62 ; 83.545,61.416 86.045,58.416 ; 83.545,61.416 84.295,62.916 87.545,62.916 88.545,61.416 ; 83.545,61.416 88.545,61.416 ; 86.045,58.416 88.545,61.416
  text "КУВЗ LM135Z" at 97.197,67.375 h4
  text "LM135Z" at 67,64.25 h10
  text "ADJ" at 109.881,62.375 h2
  text "LM135Z" at 67.75,60 h2
  text "V+" at 110.002,59.875 h2
  text "V-" at 110.002,57.125 h2
  text "V-" at 66.752,53.25 h2
  text "V+" at 69.252,53.25 h2
  text "ADJ" at 71.752,53.25 h2
  text "ИЛ1299ТО1/1" at 58.052,2.123 h7
Bottom Overlay:
  text "ИЛ1299ТО1/1" at 85.125,2.125 h7
Board:
  lines w0.2: 94.5,67.75 94.5,72 116,72 116,53.125 94.503,53.125 94.503,68.807 ; 0,0 0,72 92,72 92,0 0,0
Board (Mech4):
  drawing of 183 lines, arcs and shapes, not listed

## Dimensions
0,72 to 0,0 on Mechanical 13
0,72 to 116,72 on Mechanical 13

## Text inside footprints (layer, text, board x,y; h text height)
K1: Top Overlay "+" at 19.22,32.45 h2 r180; Top Overlay "-" at 19.07,27.14 h2 r180
VD1: Top Overlay "+" at 67.804,22.766 h2
VD2: Top Overlay "+" at 67.854,26.016 h2
VD4: Bottom Overlay "+" at 19.002,26.885 h2 r270